# Altium PCB Sound_Sensor.PcbDoc (part 3 of 3)
Units mil, origin at the board's own origin, x right, y up, seen from the top; angles counter-clockwise.
Board outline 3543.31 x 3543.31 mil, 2 copper layers (Top Layer, Bottom Layer), stack 57 mil thick; 199 components, 167 nets, 606 pads, 246 vias.
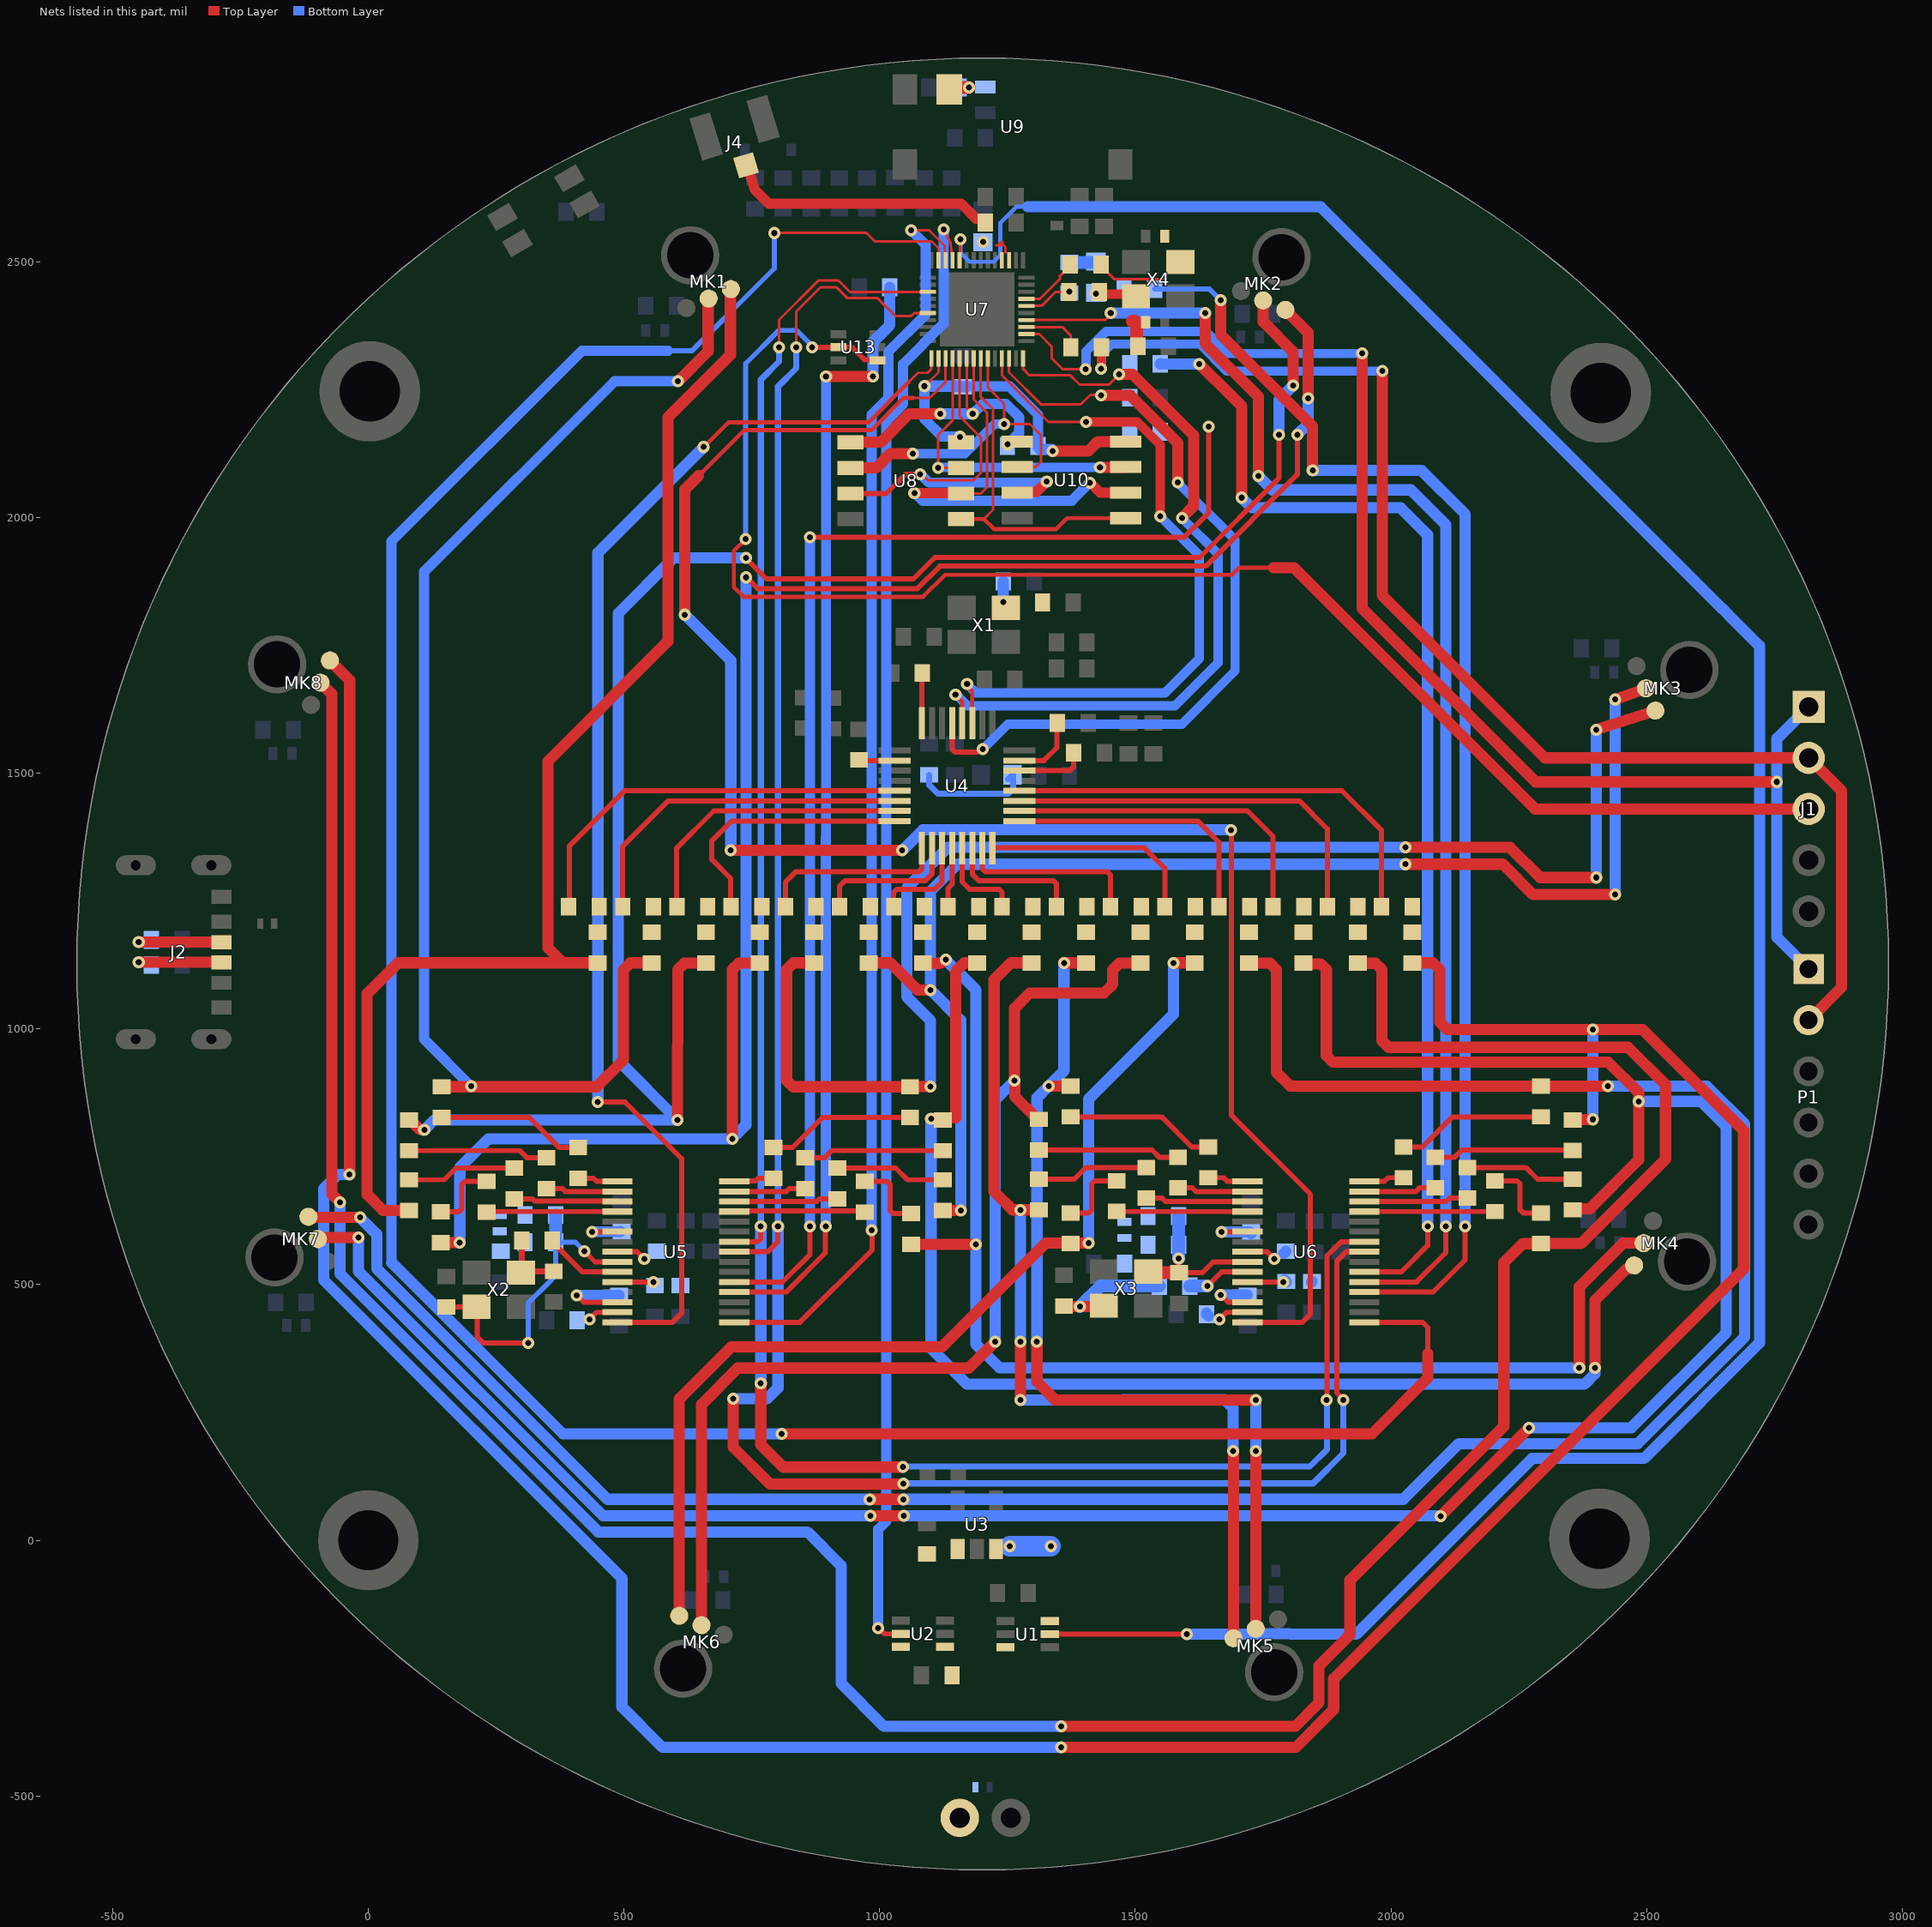
[diagram p2: the nets of this part, all layers, seen from the top]

## Via types
v1: diameter 23.62, hole 11.81, Top Layer to Bottom Layer, tented both sides, 246 vias

## Nets (pads, with @x,y where several pads share a name; then routed paths per layer and width w, separated by ;. In a path a pad name is that pad's centre, name@x,y a point inside that pad or via, vN(x,y) a via of type N, cw(c..) or ccw(c..) an arc to the next point about the centre after c; other vN are vias at no path point) (continued)
INTA#: SB2.1 U6.21 | length 2300.9
  Top Layer w10: U6.21@1947.87,524.69 2020,524.69 2071.76,576.45 v1(2071.76,614.06)
  Top Layer w22: v1(1625,2300) 1625.44,2300 1656.86,2268.58 1657.58,2268.58 1708,2218.16 v1(1708,2039)
  Bottom Layer w22: SB2.1@1549,2300.67 1549.36,2300.31 1624.69,2300.31 v1(1625,2300) ; v1(1708,2039) 1728,2019 2019,2019 2071.76,1966.24 v1@2071.76,614.5
INTB: SB1.1 U5.20 | length 2540.6
  Top Layer w10: U5.20@715.69,505.01 810.01,505.01 864,559 v1@864,614 ; v1(864,1961.43) 1595.43,1961.43 1643.81,2009.81 v1(1643.81,2177.52)
  Bottom Layer w20: v1(864,614.06) v1(864,1961.43)
INTB#: SB3.2 U6.20 U7.42 | length 2726.9
  Top Layer w5: U7.42@1287.26,2386.33 1441.33,2386.33 v1@1451,2396
  Top Layer w10: U6.20@1947.87,505.01 2050.01,505.01 2107.64,562.64 v1(2107.64,614.06)
  Top Layer w22: v1(1636.75,2400) 1636.75,2340.25 1741,2236 v1(1741,2081)
  Bottom Layer w22: v1(1452,2400) v1@1636.31,2400 ; v1(1741,2081) 1768,2054 2039.01,2054 2107.64,1985.37 v1(2107.64,614.06)
INTC: SB5.1 U5.19 | length 2205.1
  Top Layer w10: U5.19@715.69,485.32 817.32,485.32 894,562 v1@894,616
  Top Layer w22: v1@895.33,2275.73 v1@987.05,2275.73
  Bottom Layer w20: v1(895,614.06) 895,1375 895.19,1375.19 v1(895.19,2275.59)
  Bottom Layer w22: v1(987.19,2275.87) 987.19,2343.5 1020,2376.31 SB5.1@1020,2450
INTC#: SB3.1 U6.19 | length 2563.7
  Top Layer w10: U6.19@1947.87,485.32 2082.06,485.32 2145,548.26 v1(2145,614.06) v1@2145,617
  Top Layer w22: v1(1667,2425) 1667,2358 1846.85,2178.15 v1@1846.85,2092
  Bottom Layer w10: SB3.1@1538,2447 1645,2447 v1(1667,2425)
  Bottom Layer w22: v1(1847,2092) 2060,2092 2145,2007 v1(2145,614.06)
LRCKA: U5.16 U7.12 | length 2485.5
  Top Layer w5: v1(1062,2562) 1096.86,2562 1127.21,2531.65 1127.56,2516.7 U7.12@1128.99,2503.26
  Top Layer w10: U5.16@715.69,426.27 844.27,426.27 985.69,567.69 985.69,604.9 v1(984.19,606.41)
  Bottom Layer w20: v1(984.19,606.41) 984.19,2201.05 1017,2233.86 1017,2324 1090.41,2397.41 1090.41,2533.15 v1@1062,2561.56
  Bottom Layer w22: v1@1062,2561.56 v1(1062,2562)
LRCKB: U6.16 U7.13 | length 5243.7
  Top Layer w5: v1(794.39,2556.39) 974.61,2556.39 991,2540 1101.89,2540 1115.21,2526.68 U7.13@1115.21,2503.26
  Top Layer w10: U6.16@1947.87,426.27 2061.73,426.27 2072,416 2072,365
  Top Layer w22: v1(808.13,208.06) 1963.06,208.06 2072,317 2072,365
  Bottom Layer w10: 586,2326 633,2326 794.19,2487.19 v1@794.19,2556.19
  Bottom Layer w15: v1@794.19,2556.19 v1(794.39,2556.39)
  Bottom Layer w20: 45.69,543.1 45.69,1954.07 417.62,2326 586,2326
  Bottom Layer w22: 45.69,543.1 380.73,208.06 v1(808.13,208.06)
MIC_OUTS.OUT1_N: MK1.2 SB23.1 SB29.1 | length 2495.6
  Top Layer w22: SB29.1@143.52,886.86 446.86,886.86 499.03,939.03 499.03,1115.59 512.5,1129.06 SB23.1@554.03,1129.06 ; v1(605.81,2266.48) 664.69,2325.36 MK1.2@664.69,2428.26
  Bottom Layer w20: v1(201,888) 109,980 109,1894 481.48,2266.48 v1(605.81,2266.48)
MIC_OUTS.OUT1_P: MK1.3 SB22.1 SB32.1 | length 2440.7
  Top Layer w22: SB32.1@79.52,644.86 28.9,644.86 -2.31,676.06 -2.31,1068.69 58.06,1129.06 380.69,1129.06 ; SB22.1@448.69,1129.06 380.69,1129.06 ; MK1.3@708.18,2446.72 708.18,2318.18 586,2196 586,1758 351.69,1523.69 351.69,1158.06 380.69,1129.06
MIC_OUTS.OUT2_N: MK2.2 SB24.1 SB30.1 | length 3752.6
  Top Layer w10: v1@738.81,1920.07 778.88,1880 1066,1880 1108,1922 1626,1922 1780.97,2076.97 v1(1780.97,2161.81)
  Top Layer w12: v1@738.81,1920.07 v1(738.81,1921)
  Top Layer w22: SB30.1@79.52,821.86 79.93,822.27 81.61,822.27 100.77,803.1 109.22,803.1 v1(109.54,802.79) ; v1@604.77,822.06 605.36,1115.59 618.25,1128.48 SB24.1@660.36,1129.06 ; MK2.2@1750.18,2424.49 1750.18,2382.57 1808.58,2324.17 v1@1808.58,2259.02
  Bottom Layer w22: v1(109.54,802.79) 109.97,802.79 129.24,822.06 v1(604.69,822.06) 489,937.75 489,1813 597,1921 v1(738.81,1921) ; v1(1780.97,2161.81) 1780.97,2230.53 1808.58,2258.14 v1(1808.58,2258.58)
MIC_OUTS.OUT2_P: MK2.3 SB25.1 SB34.1 | length 3770.5
  Top Layer w10: v1@739.46,1883 761.46,1861 1074,1861 1118,1905 1638,1905 1817.04,2084.04 v1(1817.04,2161.81)
  Top Layer w12: v1(738.81,1883) v1@739.46,1883
  Top Layer w22: SB34.1@138.38,582 v1(179,582) ; v1@711.69,785.37 711.69,1115.59 724.58,1128.48 SB25.1@765.69,1129.06 ; MK2.3@1793.99,2405.72 1838.39,2361.31 v1(1838.39,2233.08)
  Bottom Layer w22: v1(179,582) 179,729 235.06,785.06 v1(711.69,785.06) ; v1@712,785.37 738.69,812.06 738.69,1882.88 v1(738.81,1883) ; v1(1817.04,2161.81) 1817.04,2162.25 1838.39,2183.6 v1(1838.39,2233.08)
MIC_OUTS.OUT3_N: MK3.2 SB11.1 SB36.1 | length 2657.9
  Top Layer w22: SB11.1@978.36,1129.06 1020.69,1129.06 1073.69,1076.06 v1(1099.69,1076.06) ; SB36.1@1123.52,644.86 v1(1158.68,644.86) ; v1(2028.69,1322.06) 2218.94,1322.06 2278.31,1262.69 v1(2438.69,1262.69) ; v1(2438.69,1644.06) 2498.51,1665.37 ccw(c2491.19,1686.11) MK3.2@2498.57,1665.39
  Bottom Layer w22: v1(1158.68,644.86) 1158.68,1017.08 v1(1099.69,1076.06) 1099.69,1269.56 1152.19,1322.06 v1(2028.69,1322.06) ; v1(2438.69,1262.69) v1(2438.69,1644.06)
MIC_OUTS.OUT3_P: MK3.3 SB10.1 SB38.1 | length 2787.2
  Top Layer w22: SB10.1@872.03,1129.06 831.5,1129.06 818.03,1115.59 818.03,899.74 830.91,886.86 SB38.1@1059.52,886.86 1059.62,886.96 1099.59,886.96 v1(1099.69,887.06) ; v1(2028.69,1355.06) 2232.94,1355.06 2292,1296 v1(2402,1296) ; v1@2401.71,1584.99 MK3.3@2517.35,1622.58
  Bottom Layer w22: v1(1099.69,887.06) 1099.69,1016.28 1053,1062.97 1053,1275 1133.06,1355.06 v1(2028.69,1355.06) ; v1(2401.69,1585.06) 2401.69,1296.31 v1(2402,1296)
MIC_OUTS.OUT4_N: MK4.2 SB12.1 SB35.1 | length 2468.5
  Top Layer w22: SB35.1@1061.52,578.86 v1(1188.49,578.86) ; SB12.1@1084.69,1129.06 1112.35,1128.22 ccw(c1113.02,1150.21) 1128.58,1134.66 1129.06,1135.14 v1(1129.5,1135.14) ; v1(2368.47,337.25) 2368.47,495.47 2454,581 MK4.2@2494.2,581
  Bottom Layer w22: v1(1129.5,1135.14) 1188.49,1076.16 v1(1188.49,578.86) 1188.49,383.11 1234.34,337.25 v1(2368.47,337.25)
MIC_OUTS.OUT4_P: MK4.3 SB13.1 SB37.1 | length 2402.7
  Top Layer w22: SB37.1@1122.19,824.56 SB37.1@1136.44,824.56 ; SB37.1@1123.52,821.86 1127.52,825.86 1141.49,825.86 ; 1148.69,825.86 1148.69,1112.17 1161.58,1125.06 ; 1165.58,1129.06 SB13.1@1191.03,1129.06 SB13.1@1187.03,1125.06 ; v1(2399.09,337.25) 2399.09,469.09 2460.79,530.79 2465.39,530.79 2472.1,537.51 MK4.3@2475.74,537.51
  Bottom Layer w22: v1(1100.69,824.06) 1100.69,375.31 1171,305 2378.38,305 2398.78,325.4 2398.78,336.94 v1(2399.09,337.25)
MIC_OUTS.OUT5_N: MK5.2 SB15.1 SB40.1 | length 1817
  Top Layer w22: v1(1307.69,388.06) 1307.69,310.31 1343.81,274.19 v1(1735.69,274.19) ; v1(1330.69,888.06) SB40.1@1373.69,888.06 ; v1(1360.69,1129.06) SB15.1@1403.69,1129.06 ; MK5.2@1735.7,-173.13 v1(1735.69,174.25)
  Bottom Layer w22: v1(1307.69,388.06) 1307.69,865.06 v1(1330.69,888.06) 1360.69,918.06 v1(1360.69,1129.06) ; v1(1735.69,174.25) v1(1735.69,274.19)
MIC_OUTS.OUT5_P: MK5.3 SB14.1 SB42.1 | length 1849.1
  Top Layer w22: v1(1275.69,274.19) v1(1275.69,388.06) ; SB14.1@1297.36,1129.06 1256.83,1129.06 1224,1096.23 1224,681.75 1259.69,646.06 v1(1275.69,646.06) SB42.1@1311.69,646.06 ; v1(1691.69,174.25) 1692,173.94 1692,162.56 1692.21,162.36 MK5.3@1692.21,-191.59
  Bottom Layer w22: v1(1275.69,274.19) 1475.09,274.19 1475.9,275 1674.87,275 1691.69,258.17 v1(1691.69,174.25) ; v1(1275.69,388.06) v1(1275.69,646.06)
MIC_OUTS.OUT6_N: MK6.2 SB16.1 SB41.1 | length 2120.9
  Top Layer w22: MK6.2@651.69,-166.14 651.69,265.69 722.68,336.68 1174.31,336.68 v1(1225.69,388.06) ; SB41.1@1311.69,823.06 1309.19,823.06 1264.31,867.94 1264.31,898.69 v1(1264,899) 1264,1040.37 1293.69,1070.06 1438.69,1070.06 1456.03,1087.4 1456.03,1115.59 1468.91,1128.48 SB16.1@1510.03,1129.06
  Bottom Layer w22: v1(1225.69,388.06) 1225.69,860.69 v1(1264,899)
MIC_OUTS.OUT6_P: MK6.3 SB17.1 SB44.1 | length 2009.3
  Top Layer w22: MK6.3@608.2,-147.68 608.2,276.58 709.62,378 1121.63,378 1324.69,581.06 1373.69,581.06 v1(1408.69,581.06) ; v1(1574.69,1129.06) SB17.1@1616.36,1129.06
  Bottom Layer w22: v1(1408.69,581.06) 1408.69,862.69 1574.69,1028.69 v1(1574.69,1129.06)
MIC_OUTS.OUT7_N: MK7.2 SB19.1 SB46.1 | length 4922.8
  Top Layer w22: MK7.2@-98.51,589.06 -95.5,592.06 v1(-19.31,592.06) ; v1(981.69,48.06) v1(1047.69,48.06) ; SB19.1@1829.03,1129.06 1830.72,1127.37 1862.5,1127.37 1873.69,1116.17 1873.69,947.89 1886.58,935 2425,935 2484.38,875.62 2484.38,858.56 v1(2484.69,858.25) 2484.69,744.06 2388.78,648.15 2357.78,648.15 SB46.1@2355.69,646.06 ; v1@2097.31,47.31 2097.31,47.65 v1@2269.33,219.67 ; v1@2269,219.56 v1@2269,220
  Bottom Layer w22: v1(-19.31,592.06) -19.31,526.07 458.7,48.06 v1(981.69,48.06) ; v1(1047.69,48.06) 2096.87,48.06 v1@2097.31,47.62 ; v1(2270,220) 2470,220 2655.69,405.69 2655.69,809.05 2606.49,858.25 v1(2484.69,858.25)
  other v1: 2096.97,47.31
MIC_OUTS.OUT7_P: MK7.3 SB18.1 SB48.1 | length 4842
  Top Layer w22: MK7.3@-116.97,632.55 -115.67,631.25 v1(-16.09,631.25) ; v1(980.69,80.06) 1045.25,80.06 v1@1045.94,79.37 ; SB18.1@1722.69,1129.06 1729.11,1129.06 1729.19,1128.98 1763.11,1128.98 1776,1116.09 1776,915.06 1803,888.06 SB48.1@2293.69,888.06 v1(2424.53,888.06) v1@2425.11,887.48
  Bottom Layer w22: v1(-16.09,631.25) 16.69,598.47 16.69,531.09 467.72,80.06 v1@979.94,80.06 ; v1(1046.69,80.06) 2024.06,80.06 2133,189 2483,189 2692,398 2692,813.75 2617.69,888.06 v1(2424.53,888.06)
MIC_OUTS.OUT8_N: MK8.2 SB20.1 SB45.1 | length 5944.3
  Top Layer w22: MK8.2@-93.51,1677.07 -71.31,1654.87 -71.31,677.06 v1(-55.31,661.06) ; v1(1355,-364) 1813,-364 1859,-318 1859,-246 1920,-185 1920,-78 2221,223 2221,543 2258.01,580.01 2287.19,580.01 2287.25,580.06 2371.69,580.06 2537,745.37 2537,890.74 2463.74,964 1995.58,964 1982.69,976.89 1982.69,1115.45 1969.8,1128.34 1936.08,1128.34 SB20.1@1935.36,1129.06
  Bottom Layer w22: v1(-55.31,661.06) -55.31,521.06 449.69,16.06 858.94,16.06 924.69,-49.69 924.69,-279.94 1008.75,-364 v1(1355,-364)
MIC_OUTS.OUT8_P: MK8.3 SB21.1 SB47.1 | length 6316.2
  Top Layer w22: MK8.3@-75.05,1720.55 -36.5,1682.01 v1(-36.5,715.06) ; v1(1355,-405) 1814,-405 1888,-331 1888,-271 2689.69,530.69 2689.69,801.31 2492,999 v1(2395,999) 2109.58,999 2095.69,1012.89 ; SB21.1@2041.69,1129.06 2082.22,1129.06 2095.69,1115.59 2095.69,1014 ; SB47.1@2355.69,822.06 2356.38,822.75 2394.38,822.75 v1(2394.69,823.06)
  Bottom Layer w22: v1@-37.25,715.06 -59.94,715.06 -87.31,687.69 -87.31,509 496,-74.31 496,-326 575,-405 v1(1355,-405) ; v1(2394.69,823.06) 2394.69,998.69 v1(2395,999)
MISO: SB2.2 U4.20 U7.38 | length 1548.2
  Top Layer w5: v1@1148.46,1652.52 v1(1148.46,1653.69) ; U7.38@1280.57,2310.74 1280.72,2310.58 1280.72,2290.41 1293.13,2278 1373,2278 1391,2260 1448.64,2260 v1(1468.64,2280)
  Top Layer w8: v1@1148.46,1652.52 1161.53,1639.45 U4.20@1161.53,1597.61
  Top Layer w22: v1(1468.64,2280) 1495,2280 1614,2161 1614,2022 v1@1591.65,1999.65
  Bottom Layer w5: v1@1468.64,2286 1484.29,2286 1485.14,2285.14 SB2.2@1489,2289
  Bottom Layer w18: v1(1148.46,1653.69) 1149.98,1653.69 1171.67,1632 1578,1632 1662,1716 1662,1928.67 v1(1591.33,1999.33)
MOSI: SB4.2 U4.21 U7.36 | length 1594.2
  Top Layer w5: U7.36@1253.01,2310.74 1253.01,2284.13 1316.14,2221 1393,2221 1412,2240 1432,2240 v1(1433.31,2238.69)
  Top Layer w10: U4.21@1141.85,1597.61 1141.85,1546.86 1147.71,1541 1191,1541 1194.7,1544.7 1199.39,1544.7 v1(1202,1547.3)
  Top Layer w22: v1(1433.31,2238.69) 1490.5,2238.69 1583,2146.19 v1(1583,2068.48)
  Bottom Layer w18: v1(1202,1547.3) 1250.7,1596 1591,1596 1695,1700 1695,1956.48 v1(1583,2068.48)
NetC21_1: C21.1 SB10.2
NetC21_2: C21.2 U4.1 | length 366.6
  Top Layer w10: C21.2@815.69,1239.06 815.69,1287.06 835.69,1307.06 1077.04,1307.06 1082.9,1312.92 1082.9,1353.41 U4.1@1082.79,1353.52
NetC22_1: C22.1 U4.14 | length 136.3
  Top Layer w10: U4.14@1273.74,1505.09 1371.72,1505.09 1379.69,1513.06 C22.1@1379.69,1540.06
NetC23_1: C23.1 SB11.2
NetC23_2: C23.2 U4.2 | length 281.4
  Top Layer w10: C23.2@921.69,1239.06 921.69,1279.06 932.69,1290.06 1089.83,1290.06 1102.48,1302.71 U4.2@1102.48,1353.52
NetC24_1: C24.1 SB12.2
NetC24_2: C24.2 U4.3 | length 197
  Top Layer w10: C24.2@1027.69,1239.06 1027.69,1267.2 1033.55,1273.06 1107.65,1273.06 1122.16,1287.58 U4.3@1122.16,1353.52
NetC25_1: C25.1 SB13.2
NetC25_2: C25.2 U4.4 | length 117.8
  Top Layer w10: C25.2@1133.69,1239.06 1133.69,1275.06 1141.85,1283.22 U4.4@1141.85,1353.52
NetC26_1: C26.1 SB14.2
NetC26_2: C26.2 U4.5 | length 193.4
  Top Layer w10: U4.5@1161.53,1353.52 1161.53,1287.58 1176.05,1273.06 1233.83,1273.06 1239.69,1267.2 C26.2@1239.69,1239.06 C26.2@1239.69,1226.39
NetC28_1: C28.1 SB15.2
NetC28_2: C28.2 U4.6 | length 268.1
  Top Layer w10: U4.6@1181.22,1353.52 1181.22,1302.71 1193.86,1290.06 1339.83,1290.06 1345.69,1284.2 C28.2@1345.69,1239.06
NetC30_1: C30.1 SB16.2
NetC30_2: C30.2 U4.7 | length 358.4
  Top Layer w10: U4.7@1200.8,1353.41 1200.8,1312.92 1206.66,1307.06 1445.83,1307.06 1451.69,1301.2 C30.2@1451.69,1239.06
NetC32_1: C32.1 SB17.2
NetC32_2: C32.2 U4.8 | length 455
  Top Layer w10: U4.8@1220.59,1353.52 U4.8@1221.14,1354.06 ; U4.8@1221.5,1380.01 1221.5,1354.42 U4.8@1221.14,1354.06 ; C32.2@1557.69,1239.06 1557.69,1314.06 1517.69,1354.06 U4.8@1221.14,1354.06
NetC34_1: C34.1 SB18.2
NetC34_2: C34.2 U4.9 | length 533.2
  Top Layer w10: U4.9@1273.74,1406.66 1622.09,1406.66 1663.69,1365.06 C34.2@1663.69,1239.06
NetC35_1: C35.1 SB19.2
NetC35_2: C35.2 U4.10 | length 653.8
  Top Layer w10: U4.10@1273.74,1426.35 1719.4,1426.35 1769.69,1376.06 C35.2@1769.69,1239.06
NetC36_1: C36.1 U4.24 | length 98.8
  Top Layer w10: U4.24@1082.79,1597.61 1082.79,1695.16 C36.1@1083.69,1696.06
NetC37_1: C37.1 SB20.2
NetC37_2: C37.2 U4.11 | length 776.9
  Top Layer w10: U4.11@1273.74,1446.03 1820.97,1446.03 1875.69,1391.31 C37.2@1875.69,1239.06
NetC38_1: C38.1 SB21.2
NetC38_2: C38.2 U4.12 | length 889.3
  Top Layer w10: U4.12@1273.74,1465.72 1904.28,1465.72 1981.69,1388.31 C38.2@1981.69,1239.06
NetC39_1: C39.1 SB22.2
NetC39_2: C39.2 U4.29 | length 800.4
  Top Layer w10: C39.2@391.69,1239.06 393.69,1241.06 393.69,1358.06 501.35,1465.72 U4.29@1029.64,1465.72
NetC40_1: C40.1 SB23.2
NetC40_2: C40.2 U4.30 | length 686.8
  Top Layer w10: C40.2@497.69,1239.06 497.69,1357.06 586.66,1446.03 U4.30@1029.64,1446.03
NetC41_1: C41.1 SB24.2
NetC41_2: C41.2 U4.31 | length 571.7
  Top Layer w10: C41.2@603.69,1239.06 602.69,1240.06 602.69,1353.06 675.98,1426.35 U4.31@1029.64,1426.35
NetC42_1: C42.1 SB25.2
NetC42_2: C42.2 U4.32 | length 518.2
  Top Layer w10: C42.2@709.69,1239.06 709,1239.75 709,1294.04 672,1331.04 672,1368 710.66,1406.66 U4.32@1029.64,1406.66
NetC43_2: C43.2 R7.1 X1.1 | length 40
  Bottom Layer w22: v1(1242,1835) R7.1@1242,1875
NetC45_1: C45.1 SB29.2 | length 291.4
  Top Layer w10: SB29.2@143.52,826.86 314.75,826.86 373.75,767.86 C45.1@410.52,767.86
NetC45_2: C45.2 U5.1 | length 79.3
  Top Layer w10: C45.2@410.52,707.86 440.52,707.86 446.52,701.86 U5.1@487.35,701.86
NetC46_1: C46.1 SB30.2 | length 274.8
  Top Layer w10: SB30.2@79.52,761.86 296.75,761.86 310.75,747.86 C46.1@348.52,747.86
NetC46_2: C46.2 U5.2 | length 141.2
  Top Layer w10: C46.2@348.52,687.86 379.52,687.86 385.2,682.17 U5.2@487.35,682.17
NetC47_1: C47.1 SB32.2 | length 215.5
  Top Layer w10: SB32.2@79.52,704.86 148.52,704.86 171.52,727.86 C47.1@285.52,727.86
NetC47_2: C47.2 U5.3 | length 204.1
  Top Layer w10: C47.2@285.52,667.86 320.52,667.86 324.98,663.39 486.44,663.39 U5.3@487.35,662.49
NetC48_1: C48.1 SB34.2 | length 142.8
  Top Layer w10: SB34.2@141.69,642.06 176.66,642.06 182.52,647.92 182.52,695.74 188.38,701.6 C48.1@231.78,701.6
NetC48_2: C48.2 U5.4 | length 256.1
  Top Layer w10: C48.2@231.78,641.6 232.98,642.8 U5.4@487.35,642.8
NetC49_1: C49.1 SB35.2 | length 146.1
  Top Layer w10: C49.1@971.26,701.6 1014.66,701.6 1020.52,695.74 1020.52,644.72 1026.38,638.86 SB35.2@1061.52,638.86
NetC49_2: C49.2 U5.27 | length 256.9
  Top Layer w10: U5.27@715.69,642.8 716.75,643.86 969,643.86 C49.2@971.26,641.6
NetC50_1: C50.1 SB36.2 | length 215.5
  Top Layer w10: C50.1@917.52,727.86 1031.52,727.86 1054.52,704.86 SB36.2@1123.52,704.86
NetC50_2: C50.2 U5.28 | length 204.1
  Top Layer w10: U5.28@715.69,662.49 877.15,662.49 882.52,667.86 C50.2@917.52,667.86
NetC51_1: C51.1 SB37.2 | length 274.8
  Top Layer w10: C51.1@854.52,747.86 892.29,747.86 906.29,761.86 SB37.2@1123.52,761.86
NetC51_2: C51.2 U5.29 | length 141.4
  Top Layer w10: U5.29@715.69,682.17 715.92,681.95 817.61,681.95 823.52,687.86 C51.2@854.52,687.86
NetC52_1: C52.1 SB38.2 | length 291.4
  Top Layer w10: C52.1@792.52,767.86 829.29,767.86 888.29,826.86 SB38.2@1059.52,826.86
NetC52_2: C52.2 U5.30 | length 79.3
  Top Layer w10: U5.30@715.69,701.86 716.6,702.76 757.42,702.76 762.52,707.86 C52.2@792.52,707.86
NetC53_2: C53.2 C54.2 U5.11 | length 70.2
  Top Layer w10: U5.11@487.35,505.01 v1(557.58,505)
NetC55_1: C55.1 U5.6 | length 104.8
  Top Layer w10: v1(437.7,603.25) U5.6@487.16,603.25
  Bottom Layer w22: v1@437.7,603.19 C55.1@493,603.75
NetC60_1: C60.1 SB40.2 | length 293.4
  Top Layer w10: SB40.2@1373.69,828.06 1551.69,828.06 1610.69,769.06 C60.1@1642.69,769.06
NetC60_2: C60.2 U6.1 | length 79.8
  Top Layer w10: C60.2@1642.69,709.06 1672.69,709.06 1679.9,701.86 U6.1@1719.52,701.86
NetC61_2: C61.2 R8.1 X2.1 | length 127
  Top Layer w10: X2.1@299.31,522.99 300,523.69 X2.1@302.38,526.06
  Top Layer w12: X2.1@300,523.69 R8.1@300,586 ; X2.1@302.38,526.06 C61.2@362.69,526.06
NetC63_1: C63.1 SB41.2 | length 274.8
  Top Layer w10: SB41.2@1311.69,763.06 1532.92,763.06 1546.92,749.06 C63.1@1580.69,749.06
NetC63_2: C63.2 U6.2 | length 141.7
  Top Layer w10: C63.2@1580.69,689.06 C63.2@1583.69,689.06 1611.69,689.06 1618.58,682.17 U6.2@1719.52,682.17
NetC64_1: C64.1 SB42.2 | length 215.5
  Top Layer w10: SB42.2@1311.69,706.06 1380.69,706.06 1403.69,729.06 C64.1@1517.69,729.06
NetC64_2: C64.2 U6.3 | length 204.6
  Top Layer w10: C64.2@1517.69,669.06 C64.2@1521.69,669.06 1552.69,669.06 1559.27,662.49 U6.3@1719.52,662.49
NetC65_1: C65.1 SB44.2 | length 146.1
  Top Layer w10: SB44.2@1373.69,640.06 1408.83,640.06 1414.69,645.92 1414.69,696.94 1420.55,702.8 C65.1@1463.95,702.8
NetC65_2: C65.2 U6.4 | length 255.9
  Top Layer w10: C65.2@1463.69,643.06 1463.95,642.8 U6.4@1719.52,642.8
NetC66_1: C66.1 SB45.2 | length 146.1
  Top Layer w10: C66.1@2203.43,702.8 2246.83,702.8 2252.69,696.94 2252.69,645.92 2258.55,640.06 SB45.2@2293.69,640.06
NetC66_2: C66.2 U6.27 | length 255.6
  Top Layer w10: U6.27@1947.87,642.8 C66.2@2203.43,642.8
NetC67_1: C67.1 SB46.2 | length 215.5
  Top Layer w10: C67.1@2149.69,729.06 2263.69,729.06 2286.69,706.06 SB46.2@2355.69,706.06
NetC67_2: C67.2 U6.28 | length 204.6
  Top Layer w10: U6.28@1947.87,662.49 2108.12,662.49 2114.69,669.06 C67.2@2149.69,669.06
NetC68_1: C68.1 SB47.2 | length 274.8
  Top Layer w10: C68.1@2086.69,749.06 2124.46,749.06 2138.46,763.06 SB47.2@2355.69,763.06
NetC68_2: C68.2 U6.29 | length 141.7
  Top Layer w10: U6.29@1947.87,682.17 2048.8,682.17 2055.69,689.06 C68.2@2086.69,689.06
NetC69_1: C69.1 SB48.2 | length 291.4
  Top Layer w10: C69.1@2024.69,769.06 2061.46,769.06 2120.46,828.06 SB48.2@2291.69,828.06
NetC69_2: C69.2 U6.30 | length 79.8
  Top Layer w10: U6.30@1947.87,701.86 1987.49,701.86 1994.69,709.06 C69.2@2024.69,709.06
NetC70_2: C70.2 C71.2 U6.11 | length 77.4
  Top Layer w10: U6.11@1719.52,505.01 v1(1789.75,505) v1@1790.69,504.06
  Bottom Layer w22: C70.2@1792.24,508.82 C70.2@1795.69,505.37 ; C71.2@1845,505.37 C71.2@1845.69,506.06
NetC72_1: C72.1 U6.6 | length 110.1
  Top Layer w10: v1@1668.69,603.25 1719.33,603.25 U6.6@1719.52,603.43
  Bottom Layer w22: v1(1668.69,603.06) 1669,602.75 1724,602.75 C72.1@1726.69,600.06
NetC73_2: C73.2 R9.1 X3.1 | length 246.1
  Top Layer w22: C73.2@1360.69,458.06 1361.38,457.37 1391.38,457.37 v1(1391.69,457.06) ; v1(1391.69,457.06) 1433.11,457.1 X3.1@1434.08,456.13
  Bottom Layer w25: v1(1391.69,457.06) 1431.63,497 R9.1@1547,497
NetC90_1: C90.1 L6.1 U9.2 | length 40.5
  Top Layer w25: U9.2@1135.98,2837.43 1139.56,2841 v1(1175,2841)
NetJ2_A5: J2.A5 R11.1 | length 161.3
  Top Layer w22: v1@-448.84,1130.47 J2.A5@-287.5,1130.47
  other v1: -449,1130.63
NetJ2_B5: J2.B5 R12.1 | length 161.8
  Top Layer w22: v1(-449,1170) -448.84,1169.84 -287.5,1169.84 J2.B5@-287.34,1169.68
NetJ4_1: J4.1 SB51.2 | length 530.6
  Top Layer w20: J4.1@738.87,2688.91 744.37,2679.02 756,2641 783,2614 1159,2614 1188.5,2584.5 1202,2584.5 1207,2579.5 SB51.2@1207,2576.5
NetL2_1: L2.1 SB7.2 | length 52.8
  Bottom Layer w5: L2.1@1421.09,2498 L2.1@1423,2499.91
  Bottom Layer w25: SB7.2@1371,2499 L2.1@1421.09,2499
NetL3_1: L3.1 SB33.2 | length 235.1
  Bottom Layer w12: SB33.2@1097,1497 1097,1477 1113.75,1460.25 1252.25,1460.25 1261,1469 1261,1495.91 L3.1@1259.91,1497 L3.1@1251.36,1488.45
NetL4_1: L4.1 SB43.2
NetL5_1: L5.1 SB50.2
NetR4_2: R4.2 U7.41 | length 116.6
  Top Layer w5: U7.41@1287.26,2372.55 1357.45,2372.55 1374,2356 R4.2@1374,2333
NetR6_2: R6.2 U7.45 | length 118.3
  Top Layer w5: U7.45@1287.26,2427.67 1313.69,2427.67 1353,2466.98 1353,2472.5 1373,2492.5 R6.2@1373,2495
NetSB8_2: SB8.2 U4.15 | length 132.4
  Top Layer w10: U4.15@1273.74,1524.77 1321.4,1524.77 1346.69,1550.06 SB8.2@1346.69,1599.06
NetSB9_2: SB9.2 U4.26 | length 70.5
  Top Layer w10: SB9.2@959.69,1526.06 960.98,1524.77 U4.26@1029.64,1524.77
NetSB26_2: SB26.2 U5.8 | length 56.9
  Top Layer w10: U5.8@487.35,564.06 525.71,564.06 ; 526.61,563.16 v1(539.71,550.06)
NetSB27_2: SB27.2 U5.13 | length 168.9
  Top Layer w10: v1(407.64,479.01) 421.01,465.64 U5.13@487.35,465.64
  Bottom Layer w22: v1(407.64,479.01) 487.74,479.01 489.74,480.01 SB27.2@490.69,479.06
NetSB28_2: SB28.2 U5.14 | length 60.3
  Top Layer w10: v1(432.52,432.06) 446.23,445.77 U5.14@487.17,445.77
NetSB70_2: SB70.2 U6.8 | length 63.8
  Top Layer w10: U6.8@1720.42,563.16 U6.8@1719.52,564.06 1757.88,564.06 ; 1758.79,563.16 v1(1771.88,550.06)
  Bottom Layer w22: SB70.2@1790.69,561.06 SB70.2@1794.69,565.06
NetSB71_2: SB71.2 U6.13 | length 110.9
  Top Layer w10: v1(1667.27,479.64) 1681.27,465.64 U6.13@1719.52,465.64 U6.13@1718.94,465.06
  Bottom Layer w22: v1@1666.69,479.06 v1@1667.13,479.06 ; v1(1667.27,479.64) SB71.2@1718.83,479.64
NetSB72_2: SB72.2 U6.14 | length 67.9
  Top Layer w10: v1(1664.69,432.06) 1678.4,445.77 1719.34,445.77 U6.14@1719.52,445.95
  Bottom Layer w22: SB72.2@1639.69,444.06 1639.69,442.37 SB72.2@1643.69,438.37
RTS: J1.3 U13.1 U13.5 | length 3085.8
  Top Layer w8: v1(738,1958) 715,1935 715,1864 734,1845 1085,1845 1128,1888 1689.5,1888 1703.5,1902 1770,1902
  Top Layer w10: v1(867.86,2333.14) U13.5@919.51,2333.14 ; U13.5@919.36,2333.3 945.7,2333.3 970.3,2308.7 ; 970.45,2308.55 U13.1@995.89,2308.55
  Top Layer w22: 1770,1902 1810,1902 2282,1430 J1.3@2817,1430
  Bottom Layer w10: v1(738,1958) 738,2300.96 803.04,2366 837.82,2366 867.86,2335.96 v1(867.86,2333.14)
RX: J1.1 P1.1 U7.40 | length 2781.6
  Top Layer w5: U7.40@1287.26,2358.77 1312.2,2358.77 1336.68,2334.29 1336.68,2311.32 1358,2290 v1(1402.81,2290)
  Top Layer w22: v1(1944,2320.81) 1944,1822 2283,1483 v1(2755,1483)
  Bottom Layer w18: v1(1402.81,2290) 1403.89,2291.08 1403.89,2324.89 1443,2364 1638.06,2364 1681.25,2320.81 v1(1944,2320.81)
  Bottom Layer w22: P1.1@2817,1117 2755,1179 2755,1568 J1.1@2817,1630
SCKA: U5.15 U7.25 | length 2540.2
  Top Layer w5: 1057,2265 1075,2283 1094,2283 1101.34,2290.34 1101.34,2297.3 1101.43,2297.3 U7.25@1101.43,2310.74
  Top Layer w8: v1(656,2138) 704,2186 978,2186 1057,2265
  Top Layer w10: v1(449,857) 502,857 612.73,746.27 612.73,444.18 594.82,426.27 U5.15@487.35,426.27
  Bottom Layer w22: v1(449,857) 449,1931 v1(656,2138)
SCKB: U6.15 U7.27 | length 3522.3
  Top Layer w5: 1065,2234 1098,2234 1128.99,2264.99 U7.27@1128.99,2310.74
  Top Layer w8: 646,2082 735,2171 984.21,2171 1047.21,2234 1065,2234
  Top Layer w10: v1@1689,1389 1687.69,1387.69 1687.69,831.56 1842.5,676.75 1842.5,442.2 1826.57,426.27 U6.15@1719.52,426.27
  Top Layer w22: v1@619,1810.44 619,2055 646,2082 ; v1(708.88,1349.25) 1043.56,1349.25 v1(1043.81,1349)
  Bottom Layer w22: v1(619,1810) 709,1720 v1@709,1349.25 ; v1(1043.81,1349) 1044.25,1349 1084.5,1389.25 v1@1688,1389.25
  other v1: 1687,1389
SCL: U5.24 U6.24 U7.17 | length 4229.6
  Top Layer w5: v1(803.43,2332.71) 803.43,2386.43 881,2464 919,2464 941.55,2441.45 U7.17@1094.74,2441.45
  Top Layer w10: U5.24@715.69,583.75 761.83,583.75 767.69,589.61 v1(767.69,614.06) ; v1(1874.23,274.19) 1875.1,275.05 1875.1,556.47 1902.38,583.75 U6.24@1947.87,583.75
  Top Layer w22: v1(767.69,306.87) 767.69,186.9 811.53,143.06 1045.01,143.06 v1(1045.67,143.72)
  Bottom Layer w10: v1(1045.67,143.72) v1@1046.01,144.06
  Bottom Layer w12: v1(767.69,614.06) 767.69,2269.69 803.43,2305.43 v1(803.43,2332.71) ; v1@1046.01,144.06 1841.69,144.06 1875.1,177.47 1875.1,273.32 v1(1874.23,274.19)
  Bottom Layer w22: v1(767.69,306.87) v1(767.69,614.06)
SCLK: SB1.2 U4.19 U7.35 | length 1421.1
  Top Layer w5: U7.35@1239.23,2310.74 1239.23,2277.77 1330,2187 v1(1403.81,2187)
  Top Layer w8: v1(1171.09,1674.31) 1171.09,1670.08 1181.22,1659.96 U4.19@1181.22,1597.61
  Top Layer w18: v1(1403.81,2187) 1504,2187 1549,2142 v1(1549,2002.33) v1@1549,1999.33
  Bottom Layer w18: v1(1171.09,1674.31) 1188.4,1657 1558,1657 1625,1724 1625,1926 v1@1548.83,2002.17
SCLK#: U7.31 U8.6 U10.6 | length 849.2
  Top Layer w5: U8.6@1159.27,2047 1198,2047 1210,2059 1210,2205.14 1184.11,2231.03 U7.31@1184.11,2310.74
  Top Layer w20: v1(1068,2048) 1068.5,2047.5 1155.77,2047.5 U8.6@1156.27,2048 ; v1(1411,2068) 1411.98,2068 1431.28,2048.7 U10.6@1481.6,2048.7
  Bottom Layer w20: v1(1068,2048) 1068.98,2048 1083.98,2033 1376,2033 v1(1411,2068)
SCS#: R10.2 U7.30 U8.1 U10.1 | length 569.3
  Top Layer w5: U7.30@1170.33,2310.74 1170.33,2214.67 v1(1182,2203) ; v1(1250,2143) 1255.7,2148.7 U10.1@1269,2148.7
  Top Layer w22: U8.1@942.3,2147.43 1002.42,2147.43 1057.99,2203 v1(1118.43,2203)
  Bottom Layer w20: v1(1182,2203) 1182.98,2203 1201.98,2222 1247.3,2222 1273,2196.3 1273,2165.5 1250.5,2143 v1(1250,2143)
  Bottom Layer w22: v1(1118.43,2203) v1(1182,2203)
SDA: U5.23 U6.23 U7.20 | length 4427.6
  Top Layer w5: v1(837,2333.14) 837,2403.03 883.97,2450 916.03,2450 937.03,2429 996,2429 1031,2394 1061.96,2394 1068.07,2400.11 U7.20@1094.74,2400.11
  Top Layer w10: U5.23@715.69,564.06 781.06,564.06 801.23,584.23 v1@801.23,614.03 ; v1(1906.69,274.19) 1906.69,275.87 1894,288.57 1894,545.61 1912.55,564.16 1947.77,564.16 U6.23@1947.87,564.06
  Top Layer w22: v1(713.69,277.06) 713.69,182.06 785.69,110.06 1045.25,110.06 1046.25,111.06 v1(1046.69,111.06)
  Bottom Layer w12: v1(801.25,614.06) 801.25,2256.25 837,2292 v1(837,2333.14) ; v1(1046.69,111.06) 1847.69,111.06 1906.69,170.06 v1(1906.69,274.19)
  Bottom Layer w22: v1(713.69,277.06) 780.04,277.06 801.23,298.25 v1@801.23,614.03
SHD#: U7.28 U8.7 U10.7 | length 636.9
  Top Layer w5: U7.28@1142.77,2310.74 1142.77,2189.77 1114.81,2161.81 1114.81,2098.19 v1(1114.81,2097.19) U8.7@1159.08,2097.19
  Top Layer w22: v1(1431,2098) 1431.31,2098.31 1481.21,2098.31 U10.7@1481.6,2098.7
  Bottom Layer w18: v1(1114.81,2097.19) 1115.72,2098.09 1430.91,2098.09 v1(1431,2098)
SI/SIO0: U7.32 U8.5 U10.5 | length 671.8
  Top Layer w5: U7.32@1197.89,2310.74 1197.89,2236.11 1222,2212 1222,2015 1204,1997
  Top Layer w8: U8.5@1159.27,1997 1204,1997 1223.57,1977.43 1345.43,1977.43 1366.7,1998.7 U10.5@1481.6,1998.7
  Top Layer w22: U10.5@1480.59,1998.31 1480.9,1998 U10.5@1481.6,1998.7
SO/SIO1: U7.33 U8.2 U10.2 | length 661.5
  Top Layer w5: U7.33@1211.67,2310.74 1211.58,2310.65 1211.58,2254.42 1243.63,2222.37 v1(1243.63,2182.69) 1293.75,2182.69 1316,2160.43 1316,2110 1304.7,2098.7 U10.2@1269,2098.7
  Top Layer w22: U8.2@942.73,2097 993,2097 1021,2125 v1(1065,2125)
  Bottom Layer w18: v1(1065,2125) 1167,2125 1224.69,2182.69 v1(1243.63,2182.69)
STATUS1: U1.5 U7.10 | length 5062.5
  Top Layer w5: U7.10@1156.55,2503.26 1156.89,2503.6 1156.89,2522.21 v1(1158.38,2544.02)
  Top Layer w10: U1.5@1333,-183.67 v1(1600.96,-183.67)
  Bottom Layer w8: v1(1158.38,2544.02) 1158.38,2517.62 1176,2500 1223,2500 1236,2513 1236,2576 1268,2608 1290,2608
  Bottom Layer w22: 1290,2608 1862,2608 2648.94,1821.06 2649.15,1821.06 2659.69,1810.52 2659.69,1810.31 2721,1749 2721,385.99 2495.01,160 2276,160 1932.33,-183.67 1803.62,-183.67 1802.79,-182.85 1740.59,-182.85 1739.77,-183.67 v1(1600.96,-183.67)
STATUS2: U2.5 U7.11 | length 2901.1
  Top Layer w5: v1(1125.31,2563.69) 1137.99,2537.84 ccw(c1158.38,2544.02) 1139.21,2534.71 1141.36,2516.49 U7.11@1142.77,2503.26
  Top Layer w10: v1(997.3,-171.54) 1008.95,-183.2 1041.13,-183.2 U2.5@1041.39,-182.94
  Bottom Layer w20: v1(997.3,-171.54) 997.3,21.51 1013,37.21 1013,2188.85 1046,2221.85 1046,2300 1125.31,2379.31 v1(1125.31,2563.69)
SWP#: U7.29 U8.3 U10.3 | length 844.1
  Top Layer w5: v1(1079,2085) 1082.31,2085 1094.31,2073 1183.83,2073 1198,2087.17 1198,2156.83 1156.55,2198.28 U7.29@1156.55,2310.74
  Top Layer w10: U8.3@942.73,2047 1013,2047 1051,2085 v1(1079,2085)
  Top Layer w20: U10.3@1269,2048.7 1270.81,2050.51 1307.32,2050.51 v1@1326.31,2069.5
  Bottom Layer w20: v1(1079,2085) 1079.98,2085 1096.6,2068.38 1324.21,2068.38 1326.02,2070.19 v1(1327,2070.19)
TX: J1.2 P1.2 R4.1 | length 2621
  Top Layer w18: R4.1@1433,2333 1433.71,2332.29 1433.71,2291.34 v1(1433.42,2291.05)
  Top Layer w22: v1(1983,2287) 1983,1848 2301,1530 J1.2@2817,1530 2881,1466 2881,1081 P1.2@2817,1017
  Bottom Layer w18: v1(1433.42,2291.05) 1434.49,2292.12 1434.49,2320.12 1453.37,2339 1626.33,2339 1678.94,2286.39 1982.39,2286.39 v1(1983,2287)
VBAT: C#1.1 D3.2 J3.1 U1.3 U2.1
VCC: C1.1 U1.6 U2.6 U3.1 U3.3 | length 85
  Top Layer w10: v1@1329.69,-10.94 v1@1334.69,-10.94
  Bottom Layer w40: v1(1254.69,-11.94) v1(1334.69,-11.94)
VCC#: L1.2 U7.3 U7.4 | length 52.6
  Top Layer w5: 1241.08,2532.41 1228,2532.41 1231.41,2532.41 1237,2538 ; 1241.5,2538 1237,2538 ; 1246,2518 1246,2529 1237,2538
  other v1: 1202.49,2539.02
VDD_SDIO: C85.1 R10.1 U7.26 U8.8 U10.8 | length 710
  Top Layer w5: v1(1088,2257) 1115.21,2284.21 U7.26@1115.21,2310.74
  Top Layer w22: v1(1157,2158) 1157,2149.27 U8.8@1159.27,2147 ; v1@1341.23,2129.98 1408.28,2129.98 1427,2148.7 U10.8@1481.6,2148.7
  Bottom Layer w20: v1(1088,2257) 1088,2192.69 1122,2158.69 1156.31,2158.69 v1(1157,2158) ; C85.1@1169.5,2256.5 1254.5,2256.5 1310,2201 R10.1@1310,2140
  Bottom Layer w22: v1(1088,2257) C85.1@1157,2257 ; C85.1@1163,2256 1169,2256 C85.1@1169.5,2256.5 ; R10.1@1306,2144 R10.1@1310,2140 1310,2137.5 1314,2133.5 v1@1337.26,2133.5
  other v1: 1338.23,2129.98
XI_A: R8.2 U5.10 | length 154.2
  Top Layer w10: R8.2@360,586 360,583.5 418.81,524.69 U5.10@487.35,524.69
XI_B: R9.2 U6.10 | length 124
  Top Layer w10: v1(1641,497) 1668.69,524.69 U6.10@1719.52,524.69
  Bottom Layer w25: R9.2@1607,497 v1(1641,497)
XO_A: C88.2 L4.2 SB39.2
XO_A#: C62.2 SB39.1 SB43.1 U5.9 X2.3 | length 632.1
  Top Layer w10: C62.2@152.69,456.06 212.69,456.06 212.69,397.81 224.44,386.06 v1(312.69,386.06) ; v1(423,565) 443.62,544.38 U5.9@487.35,544.38
  Bottom Layer w10: v1(312.69,386.06) 312.69,463.69 350,501 366.52,517.52 SB39.1@366.52,582.86 405.14,582.86 v1(423,565)
  Bottom Layer w25: SB39.1@366.52,582.86 SB43.1@366.52,636
XO_B: C89.2 L5.2 SB49.2
XO_B#: C74.2 SB49.1 SB50.1 U6.9 X3.3 | length 318.9
  Top Layer w10: v1(1585,551) 1585,523.75 C74.2@1585.69,523.06 1631.06,523.06 1652.38,544.38 U6.9@1719.52,544.38
  Top Layer w25: X3.3@1520.69,523.06 C74.2@1585.69,523.06
  Bottom Layer w25: v1(1585,551) SB49.1@1585,578 SB50.1@1585,634
XTAL_IN: C19.2 R6.1 X4.1 | length 140.9
  Top Layer w5: R6.1@1433,2495 1433,2492.5 1459.5,2466 1559,2466 1560,2467
XTAL_OUT: C20.2 C86.1 L2.2 SB6.2 X4.3 | length 134.6
  Top Layer w18: SB6.2@1430,2441 1434.22,2436.78 1497.22,2436.78 X4.3@1501.44,2432.56
  Top Layer w25: 1494,2384 1499.25,2384 1502.75,2380.5 1502.75,2334.25 C86.1@1505,2332
  other v1: 1423,2438.09
XTAL_OUT#: SB6.1 SB7.1 U7.44 | length 100.1
  Top Layer w5: U7.44@1287.26,2413.89 1316.88,2413.89 1343.99,2441 SB6.1@1370,2441
  Bottom Layer w22: SB7.1@1370.69,2436 1370.69,2441.69 v1(1371,2442)
pads on no net: U1.4 U2.4 U3.4 U4.27 U5.5 U5.22 U5.26 U6.5 U6.22 U6.26 U7.5 U7.6 U7.7 U7.8 U7.18 U7.21 U7.34 U9.3 U9.4

## Polygon pours and split planes (outlines as drawn)
GND on Top Layer "Polygon_1" (solid, remove dead copper, pour order 5): -469.96,1127.06 ccw(c1201.69,1127.06) 1201.69,-544.59 ccw(c1201.69,1127.06) 2873.35,1127.06 ccw(c1201.69,1127.06) 1201.69,2798.72 ccw(c1201.69,1127.06)
GND on Bottom Layer "Polygon_2" (solid, remove dead copper, pour order 4): -469.96,1127.06 ccw(c1201.69,1127.06) 1201.69,-544.59 ccw(c1201.69,1127.06) 2873.35,1127.06 ccw(c1201.69,1127.06) 1201.69,2798.72 ccw(c1201.69,1127.06)

## Other copper
Top Layer:
  region net GND: 474.62,2600.17 667.51,2666.58 644.6,2733.11 451.71,2666.69
  rectangle net GND: 1238,1990 1331,2018
  rectangle net MIC_OUTS.OUT2_N: 57.52,804 114,841.86
  rectangle net GND: 642,1620.06 1005.69,1818.06
  rectangle net SCS#: 1235,2124 1301,2162
  rectangle net VDD_SDIO: 1138,2150 1171,2170
  region net GND: 459.5,2647.02 684.22,2737.82 657.87,2803.05 433.15,2712.26
  region net GND: 755.32,2753.84 1042.33,2804.45 1030.11,2873.74 743.1,2823.13
  rectangle net FEED: 1251,2557 1283,2645
  rectangle net GND: -511.31,1241 -261,1348
  rectangle net GND: -355,957 -259,1059
  rectangle net 5V: -307,1076.32 -202,1104.32
  rectangle net 3V3: 1279,2488 1307,2519
  rectangle net VCC#: 1191,2527 1255,2550
  rectangle net VCC#: 1237,2487 1255,2549
  rectangle net XTAL_OUT: 1398,2419 1447,2463
  rectangle net NetR6_2: 1356,2472 1394,2514
  rectangle net XTAL_OUT: 1409,2419 1447,2461
  rectangle net GND: 1627,2493 1783,2597
  rectangle net XO_B#: 1491,497 1607,568
  rectangle net 5V: -307,1196 -202,1224
  rectangle net NetC43_2: 1219,1814 1335,1855.06
  rectangle net GND: 1463,2581 1782,2602
  rectangle net GND: 1548,2444 1673,2456
  rectangle net GND: 1627,2444 1675,2601
  rectangle net CAP2: 1329,2553 1409,2588
  rectangle net CAP1: 1329,2598 1456,2652
  rectangle net GND: 1548,2368 1617,2456
  rectangle net XTAL_OUT: 1471,2368 1530,2456
  rectangle net XTAL_IN: 1548,2463.5 1617,2572.5
  rectangle net GND: 1463,2476 1530,2588
  rectangle net GND: 1132,1799.06 1203.69,1852
  region net "DEBUG SIG.ENABLE": 434.85,2651.58 253.69,2546.98 294.37,2476.52 475.53,2581.11
  rectangle net GND: 1362.69,1810.06 1766,1855
  rectangle net ADC1_XOUT#: 1091.69,1733 1187.69,1785.06
  rectangle net GND: 1570.69,1517.06 1766,1855
  rectangle net GND: 1606.69,311 1849.69,413.06
  region net GND: 1615.08,481.13 1493.08,481.13 1493.08,311 1615.08,311
  rectangle net GND: 1339.69,498.06 1461.69,548.06
  rectangle net 3V3: 1244.69,1665 1307,1703.06
  rectangle net 3V3: 1374.69,-47.94 1631.69,186.06
  rectangle net 3V3: 896.69,166.06 1631.69,186.06
  rectangle net GND: 1067.69,14.06 1307.69,43.06
  rectangle net GND: 554.69,-308.94 1097.69,-238.94
  region net 3V3: 1174.69,54.06 1174.69,186.06 1127.69,186.06 1127.69,54.06
  rectangle net VCC: 1212.69,-75.94 1267.69,6.06
  rectangle net VCC: 1315.69,-167.94 1352.69,12.06
  rectangle net VCC: 926.69,-75.94 1166.69,6.06
  rectangle net GND: 1174.69,-37.94 1205.69,43.06
  region net GND: 1307.69,46.06 1275.69,46.06 1275.69,-191.67 1307.69,-191.67
  rectangle net GND: 1077.69,-191.94 1307.69,-174.94
  rectangle net VBAT: 1106.69,-273.94 1267.69,-199.94
  region net 5V: 1267.69,-83.67 1073.69,-83.67 1073.69,-166.67 1267.69,-166.67
  rectangle net VCC: 1161.69,-75.94 1245.69,-50.94
  rectangle net GND: 1066.69,-308.94 1098.69,-174.94
  rectangle net VCC: 926.69,-224.94 973.69,-65.94
  rectangle net VCC: 926.69,-224.94 1059.69,-199.94
  region net GND: 1114.69,14.06 1114.69,150.06 1067.69,150.06 1067.69,14.06
  rectangle net GND: 1423.69,1517.06 1621.69,1558.06
  rectangle net 3V3: 1390.69,1578.06 1560.69,1778.06
  rectangle net \C\S: 1310,1738.06 1364.69,1775.06
  rectangle net GND: 1056.69,1799.06 1143.69,1818.06
  rectangle net GND: -47.31,353.06 102.69,499.06
  region net GND: 240.31,547.99 -47.31,547.99 -47.31,489.99 240.31,489.99
  rectangle net GND: 270,432.06 381.69,490.06
  rectangle net XO_A#: 135.69,429.06 239.69,482.06
  rectangle net GND: -447.8,957 -332.31,1103.06
  rectangle net GND: -511.31,957 -469,1303.06
  region net GND: 409.99,2694.63 230.5,2591 249.66,2557.81 429.15,2661.44
  rectangle net VBAT: 1105.69,-587 1201.69,-233.94
  rectangle net GND: 996.69,1620.06 1061.69,1818.06
  rectangle net 3V3: 648.69,1565.06 1061.69,1608.06
  rectangle net NetC39_1: 428.69,1170.06 472.69,1262.06
  rectangle net NetC40_1: 534.69,1170.06 578.69,1262.06
  rectangle net NetC41_1: 640.69,1170.06 684.69,1262.06
  rectangle net NetC42_1: 746.69,1170.06 790.69,1262.06
  rectangle net NetC21_1: 852.69,1170.06 896.69,1262.06
  rectangle net NetC23_1: 958.69,1170.06 1002.69,1262.06
  rectangle net NetC24_1: 1064.69,1170.06 1108.69,1261.06
  rectangle net NetC25_1: 1170.69,1170.06 1214.69,1260.06
  rectangle net NetC26_1: 1276.69,1170.06 1320.69,1262.06
  rectangle net NetC28_1: 1382.69,1170.06 1426.69,1262.06
  rectangle net NetC30_1: 1488.69,1170.06 1532.69,1262.06
  rectangle net NetC32_1: 1594.69,1170.06 1638.69,1262.06
  rectangle net NetC34_1: 1700.69,1170.06 1744.69,1262.06
  rectangle net NetC35_1: 1806.69,1170.06 1850.69,1262.06
  rectangle net NetC37_1: 1912.69,1170.06 1956.69,1262.06
  rectangle net NetC38_1: 2018.69,1170.06 2062.69,1262.06
  rectangle net NetC32_2: 1214.69,1322.06 1304.69,1385.06
  rectangle net MIC_OUTS.OUT4_P: 1084.69,805.06 1159.69,844.06
  pour cut-out: 615.35,2790.85 674.02,2630.86 831.18,2691.01 772.9,2838.95
  pour cut-out: 936,2869 936,2655 1502,2655 1502,2869 937,2869
Bottom Layer:
  rectangle net NetJ2_A5: -466,1104 -409,1146
  rectangle net NetJ2_B5: -466,1153 -409,1195
  rectangle net GND: 1362,1726 1600,1856
  rectangle net GND: 735,2641 1169,2688
  rectangle net VDD_SDIO: 1293,2116 1349,2145
  rectangle net 3V3: 729.65,2584 1226,2628
  rectangle net NetC90_1: 1141,2816.57 1230.02,2859
  rectangle net FEED#: 1185,2726 1231,2804
  rectangle net INTB: 1531,2150 1658,2200
  region net 3V3: 1699,2453 1726.5,2480.5 1650.5,2556.5 1623,2529
  rectangle net 3V3: 1289,2526 1651,2558
  rectangle net 3V3: 1691.69,2337 1725,2483
  rectangle net 3V3: 361.69,305 740.69,398.06
  rectangle net 3V3: 331.69,355.06 375.69,458.06
  rectangle net ADC1_XIN: 1277,1781 1320,1895.06
  rectangle net NetL4_1: 238,621 321.52,653
  rectangle net XO_A: 238,535 321.52,611
  rectangle net NetL5_1: 1463,610 1540,651
  rectangle net XO_B: 1464,523 1540,598
  region net GND: 1298,-468 1206,-468 1206,-585 1298,-585
  rectangle net VBAT: 1110,-585 1196,-468
  rectangle net 3V3: 1332.44,2393 1354,2417
  rectangle net INTB#: 1435,2384 1467,2411
  rectangle net 3V3: 1341,2243 1384,2417
  region net INTB#: 1494,2466 1451,2466 1451,2384 1494,2384
  region net GND: 558.69,2557.06 226,2557.06 226,2351.06 558.69,2351.06
  rectangle net GND: 226,2547 310,2593
  rectangle net 3V3: 1289,2330.33 1343,2543.3
  rectangle net INTC#: 1511,2419 1556,2465
  rectangle net GND: 1145,2301 1220,2372
  rectangle net \C\S: 944,2428 984,2471
  rectangle net MISO: 1456,2268 1508,2319
  region net MOSI: 1508,2260.33 1421,2260.33 1421,2214 1508,2214
  region net SCLK: 1508,2200 1393,2200 1393,2151 1508,2151
  rectangle net GND: 1733.69,2340.06 1846,2566
  rectangle net 3V3: 2250,370.06 2482.69,543.06
  rectangle net 3V3: 1591.69,-35.94 1791.19,3.06
  rectangle net GND: 555.69,-310.94 669.69,-54.94
  rectangle net 3V3: 1562.69,356.06 2482.69,380.06
  rectangle net GND: -179.31,312 -16.31,389.06
  rectangle net 3V3: -137.31,401.06 -89.31,485.06
  rectangle net GND: 1232.69,-334.94 1835.69,-205.94
  rectangle net GND: -222.31,312 -144.31,649.06
  region net GND: -172.31,1773.06 -395.31,1773.06 -395.31,378.06 -172.31,378.06
  rectangle net 3V3: -163.31,1520.06 -92.31,1610.06
  rectangle net GND: 531.69,2453 689,2561
  rectangle net 3V3: 426.69,2571.06 498,2666
  rectangle net GND: 2514.69,485.06 2636.69,687.06
  rectangle net GND: 2320.69,654.06 2636.69,687.06
  rectangle net GND: 2524.69,1643.06 2641.69,1780.06
  rectangle net GND: 2356.69,1770.06 2641.69,1799
  rectangle net GND: 2320.69,564.06 2421.69,687.06
  region net 3V3: 2496.69,646.06 2429.69,646.06 2429.69,356.06 2496.69,356.06
  rectangle net GND: 1232.69,-130.94 1750.19,-47.94
  rectangle net 3V3: 1758.19,-130.94 1791.19,3.06
  rectangle net 3V3: 678.69,-156.94 742.69,-2.94
  region net GND: 2408.69,1799 2356.69,1799 2356.69,1682.06 2408.69,1682.06
  rectangle net 3V3: 2417.69,1682.06 2513.69,1763.06
  rectangle net 3V3: 570.69,2351.06 637.69,2434.06
  rectangle net NetSB28_2: 391.69,408.06 444.69,458.06
  rectangle net 3V3: 470.69,355.06 514.69,439.75
  rectangle net 3V3: 702.69,355.06 740.69,611.06
  rectangle net GND: 538.69,417.06 688.69,468.06
  rectangle net GND: 645.69,417.06 688.69,590.06
  rectangle net GND: 596.69,530.06 651.69,590.06
  rectangle net NetC53_2: 522.52,476.06 631.52,522.06
  rectangle net NetSB26_2: 524.69,533.06 582.69,596.06
  rectangle net 3V3: 540.69,605.06 740.69,642.06
  rectangle net NetSB70_2: 1754.69,533.06 1812.69,596.06
  rectangle net NetC70_2: 1754.69,476.06 1863.69,522.06
  rectangle net GND: 1831.69,538.06 1886.69,598.06
  rectangle net GND: 1880.69,425.06 1923.69,598.06
  rectangle net GND: 1773.69,387.06 1923.69,465.06
  rectangle net 3V3: 1933.69,356.06 1971.69,610.06
  rectangle net 3V3: 1775.69,605.06 1971.69,642.06
  rectangle net 3V3: 1701.69,357.06 1745.69,438.75
  rectangle net 3V3: 1562.69,358.06 1606.69,461.75
  rectangle net NetSB72_2: 1624.69,417.06 1677.69,460.06
  rectangle net "DEBUG SIG.ENABLE": 332.69,2571.06 401.69,2618.06

## Silkscreen, mask and mechanical layers (free items; w line width, h text height)
Top Overlay:
  lines w10: 1461,2495 1478.25,2512.25 1478.25,2565.25 1501,2588 1521,2588
  text "~" at 1548.59,2739.64 h90 r90
  text "`" at 1573.05,2681 h90 r90
  text "`" at 1410.56,2648.58 h90 r90
  text "~" at 1346.37,2605.5 h90 r90
  text "@" at 1744.17,2602.39 h70 r337
  text "*" at 1504,2577.98 h110
  text "@" at 532.67,2546.34 h70 r23
  text "@" at 2615.97,1798.09 h70 r293
  text "#" at 891.69,1671.81 h70
  text "@" at -271.79,1670.54 h70 r67
  text "*" at 834,1636.98 h110
  text "RX" at 2677.68,1599.31 h50
  text "*" at 1456,1550.02 h110 r180
  text "TX" at 2677.68,1499.31 h50
  text "#" at 1470,1466.38 h70
  text "*" at 1520,1440.26 h110
  text "RTS" at 2660.09,1399.31 h50
  text "*" at 411.69,1339.08 h110 r180
  text "*" at 517.69,1339.08 h110 r180
  text "*" at 623.69,1339.08 h110 r180
  text "*" at 729.69,1339.08 h110 r180
  text "*" at 835.69,1339.08 h110 r180
  text "*" at 941.69,1339.08 h110 r180
  text "*" at 1047.69,1339.08 h110 r180
  text "*" at 1153.69,1339.08 h110 r180
  text "*" at 1259.69,1339.08 h110 r180
  text "*" at 1365.69,1339.08 h110 r180
  text "*" at 1471.69,1339.08 h110 r180
  text "*" at 1577.69,1339.08 h110 r180
  text "*" at 1683.69,1339.08 h110 r180
  text "*" at 1789.69,1339.08 h110 r180
  text "*" at 1895.69,1339.08 h110 r180
  text "*" at 2001.69,1339.08 h110 r180
  text "DTR" at 2655.75,1299.31 h50
  text "GND" at 2649.06,1199.31 h50
  text "RX" at 2677.68,1086.31 h50
  text "TX" at 2677.68,986.31 h50
  text "USB" at -491,915 h70
  text "IO_0" at 2660.09,886.31 h50
  text "IO_2" at 2655.75,786.31 h50
  text "EN" at 2655.75,686.31 h50
  text "@" at 2672.48,587.52 h70 r247
  text "GND" at 2649.06,586.31 h50
  text "@" at -214.59,457.04 h70 r113
  text "#" at 1362.94,-119.94 h70 r90
  text "#" at 1008.44,-247.94 h70 r270
  text "@" at 1868.72,-292.21 h70 r203
  text "@" at 658.21,-344.42 h70 r157
  text "BATTERY" at 1055,-362.17 h70
  text "+VE" at 1055,-410.17 h50
  text "-VE" at 1196.33,-410.17 h50
Bottom Overlay:
  drawing of 3070 lines, arcs and shapes, not listed
  text "#" at 773,2532.75 h70
  text "#" at 883,2532.75 h70
  text "*" at 958,2506.98 h110
  text "*" at 1013,2506.98 h110
  text "*" at 794,2505.98 h110
  text "*" at 904,2505.98 h110
  text "#" at 1841.94,2415.06 h70 r90
  text "#" at 469.44,2397.06 h70 r270
  text "#" at 1180,2343.75 h70
  text "#" at 2298.94,1730.06 h70 r270
  text "RX" at 2764.68,1600.31 h50
  text "#" at -279.56,1568.06 h70 r270
  text "*" at 1295,1507.02 h110 r180
  text "TX" at 2764.68,1500.31 h50
  text "RTS" at 2764.68,1400.31 h50
  text "DTR" at 2764.68,1300.31 h50
  text "GND" at 2764.68,1200.31 h50
  text "RX" at 2764.68,1087.31 h50
  text "TX" at 2764.68,987.31 h50
  text "Note:" at -153,985 h60
  text "# >> 1uF 0603" at -153,936 h60
  text "* >>0.1uF 0603" at -153,888 h60
  text "IO_0" at 2764.68,887.31 h50
  text "ZERO CARBON FOOTPRINT" at 1515.51,865.28 h38
  text "@ >>MK1-MK8" at -153,829 h60
  text "IO_2" at 2764.68,787.31 h50
  text "#" at 1709.69,733.31 h70 r180
  text "*" at 654.69,724.08 h110 r180
  text "*" at 1885.69,724.08 h110 r180
  text "EN" at 2764.68,687.31 h50
  text "#" at 2312.44,611.06 h70 r270
  text "GND" at 2764.68,587.31 h50
  text "#" at 512.69,530.81 h70
  text "*" at 1828.69,456.08 h110 r180
  text "#" at -92.56,451.06 h70 r270
  text "*" at 593.69,449.08 h110 r180
  text "#" at 1812.69,372.81 h70
  text "#" at 576.69,365.81 h70
  text "#" at 1642.75,-123 h70 r270
  text "#" at 559.94,-133.94 h70 r270
Mechanical 1:
  lines w10: 2608.7,1715.9 2618.79,1711.77
Mechanical 2:
  circle w10: c1201.69,1127.06 r1771.65